# Altium PCB Mega2560_Custom.PcbDoc (part 3 of 5)
Units mil, origin at the board's own origin, x right, y up, seen from the top; angles counter-clockwise.
Board outline 4724.41 x 2992.13 mil, 2 copper layers (Top Layer, Bottom Layer), stack 57 mil thick; 197 components, 130 nets, 758 pads, 836 vias.
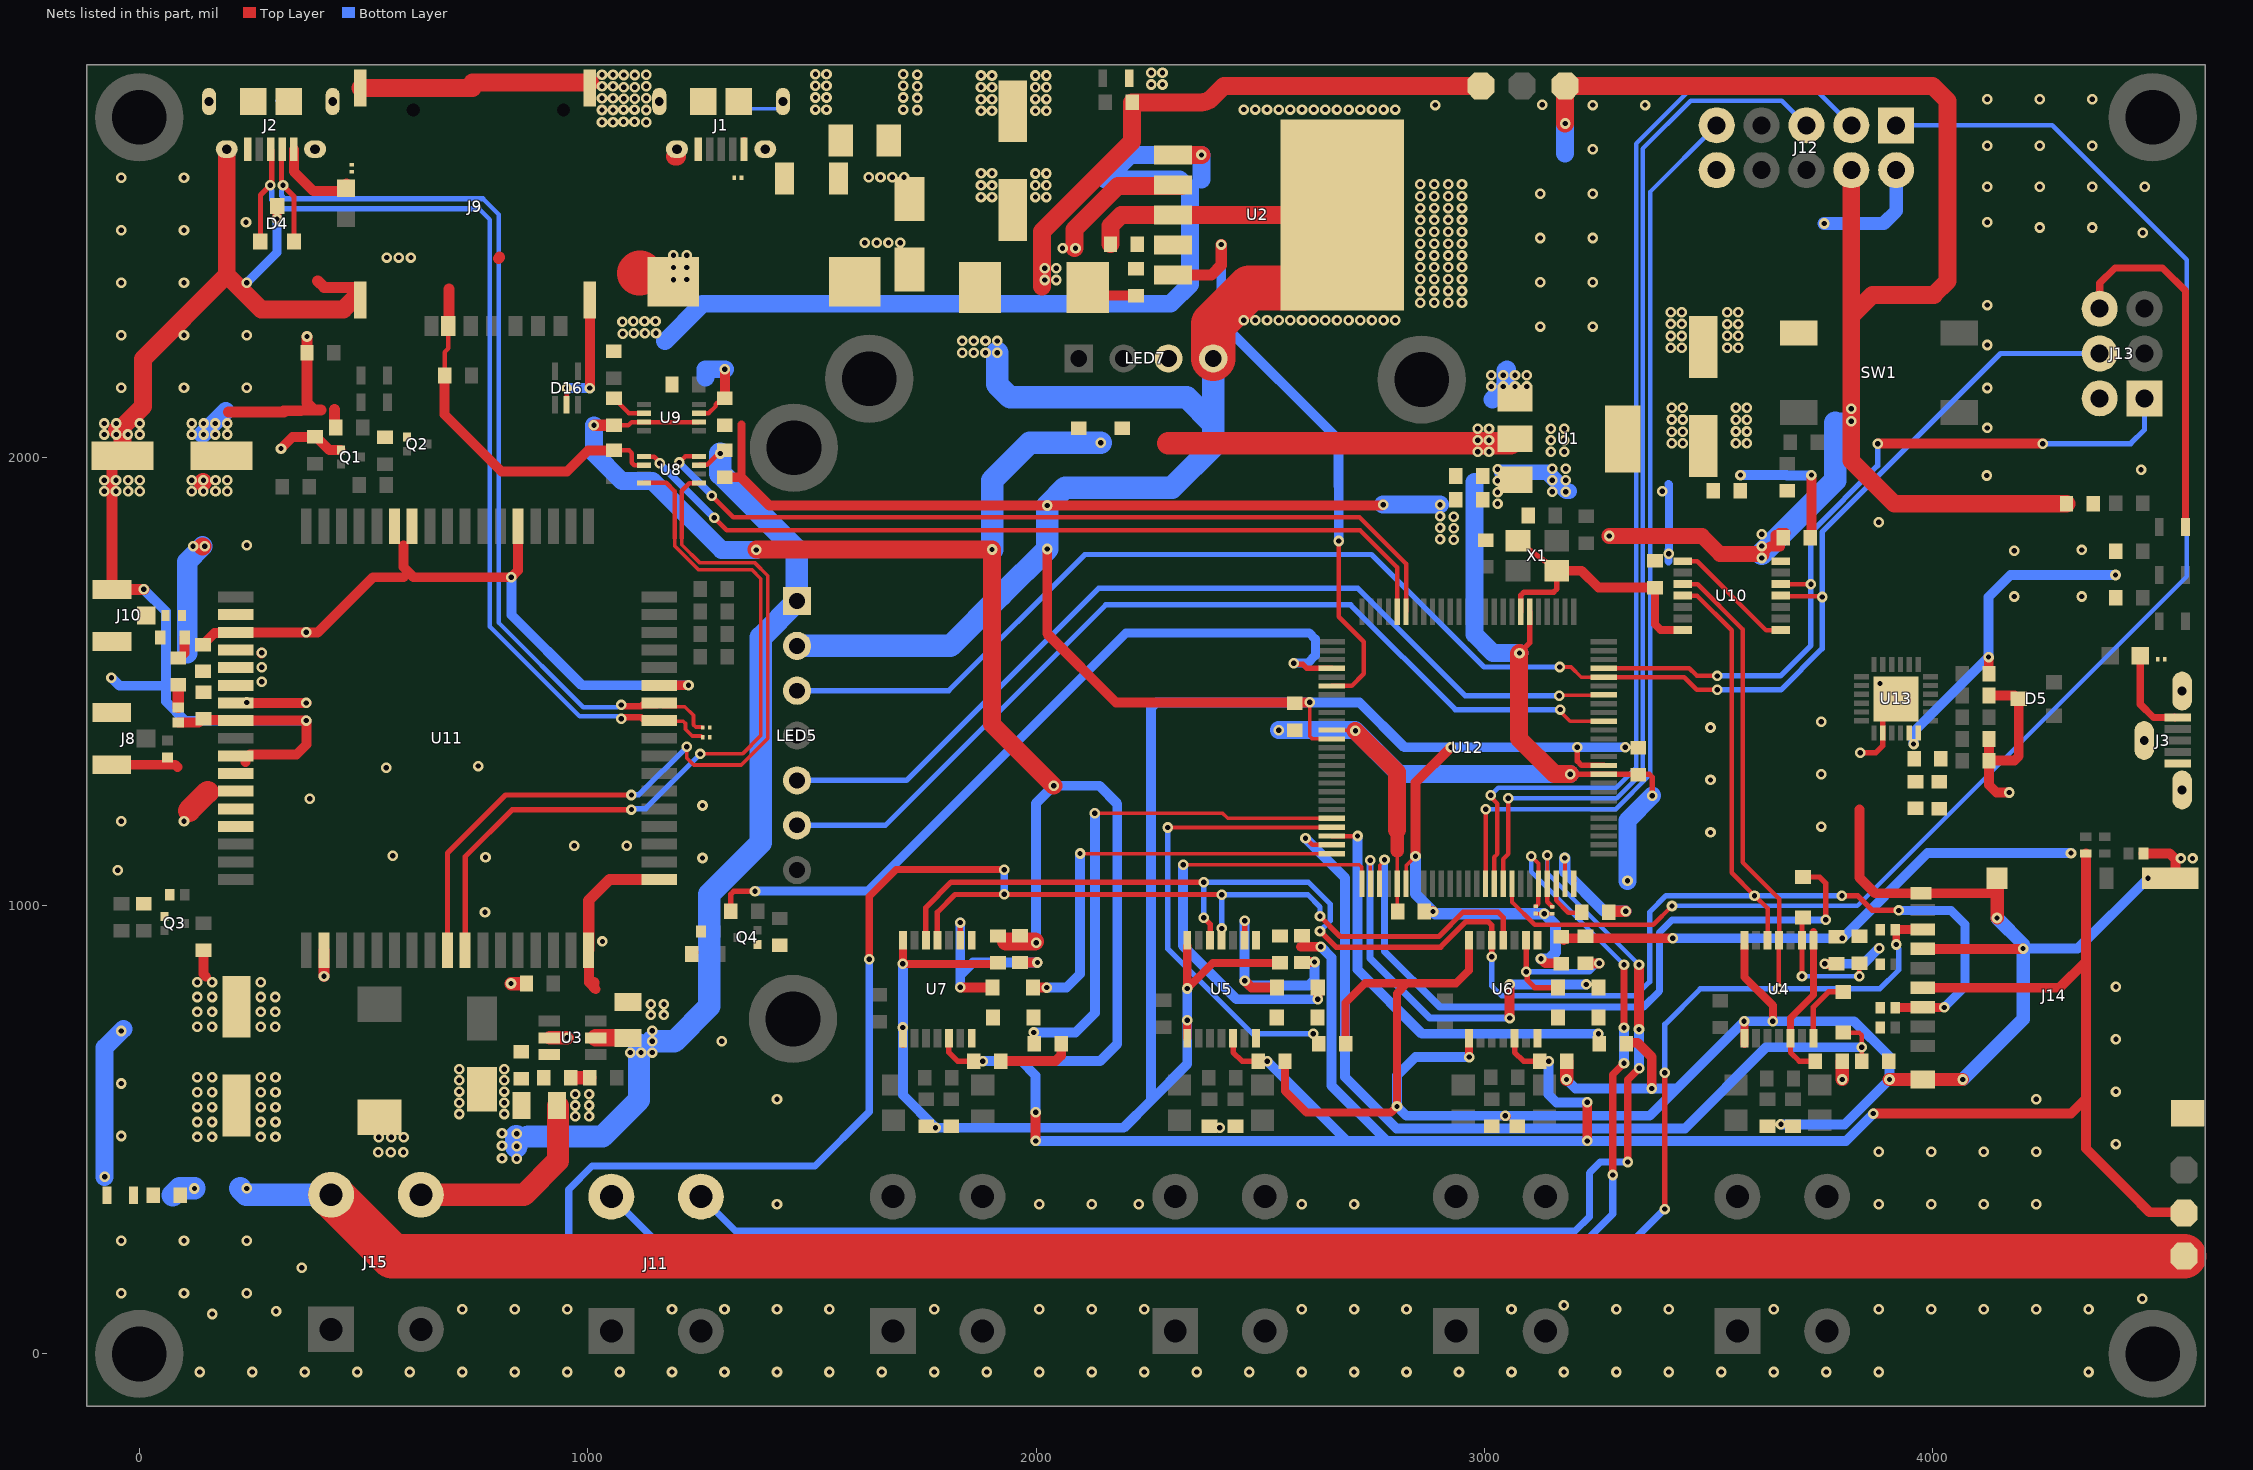
[diagram p2: the nets of this part, all layers, seen from the top]

## Part data (continued)
R43: library part RC0603FR-0747K5L, "RES 47.5K OHM 1% 1/10W 0603", Case Code (Imperial)=0603, Case Code (Metric)=1608, LCSC Part Number=C137715, Manufacturer=Yageo, Max Operating Temperature=155°C, Max Power Dissipation=100mW, Min Operating Temperature=-55°C, Package Quantity=5000, Resistance=47.5kR, Resistance Tolerance=1%, Resistor Type="Thick Film", Temperature Coefficient=100ppm/°C, Voltage Rating=50V, Case/Package=0603, Category="Chip SMD Resistors", ComponentLink1Description=https://datasheet.ciiva.com/11808/0900766b80f96399-11808343.pdf?src-supplier=RSComponents, ComponentLink1URL=https://datasheet.ciiva.com/11808/0900766b80f96399-11808343.pdf?src-supplier=RSComponents, ComponentLink2Description=https://datasheet.ciiva.com/2454/pyu-r-int-thick-7-2454790.pdf?src-supplier=Digi-Key, ComponentLink2URL=https://datasheet.ciiva.com/2454/pyu-r-int-thick-7-2454790.pdf?src-supplier=Digi-Key, ComponentLink3Description=https://datasheet.ciiva.com/2454/pyu-r-int-thick-7-2454791.pdf?src-supplier=Digi-Key, ComponentLink3URL=https://datasheet.ciiva.com/2454/pyu-r-int-thick-7-2454791.pdf?src-supplier=Digi-Key, ComponentLink4Description=https://datasheet.ciiva.com/2454/pyu-r-int-thick-7-2454789.pdf?src-supplier=Digi-Key, ComponentLink4URL=https://datasheet.ciiva.com/2454/pyu-r-int-thick-7-2454789.pdf?src-supplier=Digi-Key, ComponentLink5Description=https://datasheet.ciiva.com/12555/rc0603-272842-12555285.pdf?src-supplier=Mouser, ComponentLink5URL=https://datasheet.ciiva.com/12555/rc0603-272842-12555285.pdf?src-supplier=Mouser, ComponentLink6Description=https://datasheet.ciiva.com/15189/getdatasheetpartid-135115-15189741.pdf?src-supplier=Verical, ComponentLink6URL=https://datasheet.ciiva.com/15189/getdatasheetpartid-135115-15189741.pdf?src-supplier=Verical, Construction=Rectangular, Depth=0.8mm, Features="Moisture Resistant", Height=0.45mm, Item Type=Resistor, Lead Free="Lead Free", Length=1.6mm, Manufacturer Part Number=RC0603FR-0747K5L, Military Standard=Not, Number of Pins=2, Number of Terminations=2, Packaging="Tape and Reel", Power Rating=100mW, Pricing 1="5000=0.00133, 10000=0.00131, 20000=0.00127 (USD)", Reach SVHC Compliant=Yes, RoHS=Yes, RoHS Compliant=Yes, Series=RC, Size Code=0603, Stock 1=20000, Supplier 1=Avnet, Supplier Part Number 1=RC0603FR-0747K5L, Technology="THICK FILM", Termination=SMD/SMT, Tolerance=1%, Voltage Rating (DC)=50V, Width=0.031inch
R47: library part RC0402FR-0722RL, "RES 22 OHM 1% 1/16W 0402", Case Code (Imperial)=0402, Case Code (Metric)=1005, Manufacturer=Yageo, Max Operating Temperature=155°C, Max Power Dissipation=63mW, Min Operating Temperature=-55°C, Power Rating=62.5mW, Resistance=22R, Resistance Tolerance=1%, Resistor Type="Thick Film", Supplier Part Number 1=311-22.0LRCT-ND, Temperature Coefficient=100ppm/°C, Voltage Rating=50V, Case/Package=0402, Category="Chip SMD Resistors", ComponentLink1Description=https://datasheet.ciiva.com/11819/0900766b80c66297-11819462.pdf?src-supplier=RSComponents, ComponentLink1URL=https://datasheet.ciiva.com/11819/0900766b80c66297-11819462.pdf?src-supplier=RSComponents, ComponentLink2Description=https://datasheet.ciiva.com/7849/1018594-7849912.pdf?src-supplier=Element14, ComponentLink2URL=https://datasheet.ciiva.com/7849/1018594-7849912.pdf?src-supplier=Element14, ComponentLink3Description=https://datasheet.ciiva.com/7849/1018594-7849911.pdf?src-supplier=Element14, ComponentLink3URL=https://datasheet.ciiva.com/7849/1018594-7849911.pdf?src-supplier=Element14, ComponentLink4Description=https://datasheet.ciiva.com/16930/pyu-rc0402-51-rohs-l-6-r-16930687.pdf?src-supplier=Future+Electronics, ComponentLink4URL=https://datasheet.ciiva.com/16930/pyu-rc0402-51-rohs-l-6-r-16930687.pdf?src-supplier=Future+Electronics, ComponentLink5Description=https://datasheet.ciiva.com/26829/getdatasheetpartid-554995-26829991.pdf?src-supplier=Verical, ComponentLink5URL=https://datasheet.ciiva.com/26829/getdatasheetpartid-554995-26829991.pdf?src-supplier=Verical, Construction=Rectangular, Depth=0.5mm, Features="Moisture Resistant", Height=0.32mm, Lead Free="Lead Free", Length=1mm, Manufacturer Part Number=RC0402FR-0722RL, Military Standard=Not, Number of Pins=2, Number of Terminations=2, Packaging="Tape and Reel", Pricing 1="1=0.10000, 10=0.01400, 100=0.00580, 1000=0.00262, 2500=0.00228, 5000=0.00188 (USD)", Reach SVHC Compliant=Yes, RoHS=Yes, RoHS Compliant=Yes, Series=RC, Size Code=0402, Stock 1=7045379, Supplier 1=Digi-Key, Technology="THICK FILM", Termination=SMD/SMT, Tolerance=1%, Voltage Rating (DC)=50V, Width=0.5mm
R48: library part RC0402FR-07100KL, "RES 100K OHM 1% 1/16W 0402", Case Code (Imperial)=0402, Case Code (Metric)=1005, Manufacturer=Yageo, Max Operating Temperature=155°C, Max Power Dissipation=63mW, Min Operating Temperature=-55°C, Package Quantity=1, Resistance=100kR, Resistance Tolerance=1%, Resistor Type="Thick Film", Supplier Part Number 1=603-RC0402FR-07100KL, Temperature Coefficient=100ppm/°C, Voltage Rating=50V, Case/Package=0402, Category="Chip SMD Resistors", ComponentLink1Description=https://datasheet.ciiva.com/11819/0900766b80c66297-11819452.pdf?src-supplier=RSComponents, ComponentLink1URL=https://datasheet.ciiva.com/11819/0900766b80c66297-11819452.pdf?src-supplier=RSComponents, ComponentLink2Description=https://datasheet.ciiva.com/22747/1018594-22747509.pdf?src-supplier=Element14, ComponentLink2URL=https://datasheet.ciiva.com/22747/1018594-22747509.pdf?src-supplier=Element14, ComponentLink3Description=https://datasheet.ciiva.com/2453/pyu-r-int-thick-7-2453362.pdf?src-supplier=Digi-Key, ComponentLink3URL=https://datasheet.ciiva.com/2453/pyu-r-int-thick-7-2453362.pdf?src-supplier=Digi-Key, ComponentLink4Description=https://datasheet.ciiva.com/2453/pyu-r-int-thick-7-2453363.pdf?src-supplier=Digi-Key, ComponentLink4URL=https://datasheet.ciiva.com/2453/pyu-r-int-thick-7-2453363.pdf?src-supplier=Digi-Key, ComponentLink5Description=https://datasheet.ciiva.com/2453/pyu-r-int-thick-7-2453361.pdf?src-supplier=Digi-Key, ComponentLink5URL=https://datasheet.ciiva.com/2453/pyu-r-int-thick-7-2453361.pdf?src-supplier=Digi-Key, ComponentLink6Description=https://datasheet.ciiva.com/12667/pyu-rc0402-51-rohs-l-6-r-12667930.pdf?src-supplier=Mouser, ComponentLink6URL=https://datasheet.ciiva.com/12667/pyu-rc0402-51-rohs-l-6-r-12667930.pdf?src-supplier=Mouser, ComponentLink7Description=https://datasheet.ciiva.com/15189/getdatasheetpartid-323696-15189334.pdf?src-supplier=Verical, ComponentLink7URL=https://datasheet.ciiva.com/15189/getdatasheetpartid-323696-15189334.pdf?src-supplier=Verical, Construction=Rectangular, Depth=0.5mm, Features="Moisture Resistant", Height=0.016inch, Lead Free="Lead Free", Length=0.039inch, Manufacturer Part Number=RC0402FR-07100KL, Military Standard=Not, Number of Terminations=2, Packaging="Tape and Reel", Power Rating=63mW, Pricing 1="1=0.10000, 10=0.01200, 50=0.01200, 100=0.00500, 1000=0.00300, 2500=0.00200, 10000=0.00100 (USD)", REACH SVHC="No SVHC", RoHS=Yes, RoHS Compliant=Yes, Series=RC, Stock 1=7759549, Supplier 1=Mouser, Technology="THICK FILM", Termination=SMD/SMT, Tolerance=1%, Width=0.02inch, Working Voltage=50V
SB1 SB2: "Solder Bridge ON"
SW1: library part TL3301NF160QG, "SWITCH TACTILE SPST-NO 0.05A 12V", LCSC Part Number=C273526, Manufacturer=E-Switch, Manufacturer Part Number=TL3301NF160QG/TR, Package="SMD (6.00mm x 6.00mm)", ComponentLink1Description=LCSC, ComponentLink1URL=https://www.lcsc.com/product-detail/Tactile-Switches_E-Switch-TL3301NF160QG_C273526.html
U1: "15V 1.3V @ 800mA Fixed 3.3V SOT-223 Linear Voltage Regulators (LDO) ROHS", LCSC Part Number=C92102, Manufacturer="Diodes Incorporated", Package=SOT-223, ComponentLink1Description=LCSC, ComponentLink1URL=https://lcsc.com/product-detail/Linear-Voltage-Regulators-LDO_Diodes-Incorporated-AZ1117CH-3-3TRG1_C92102.html, Item Type=IC, Manufacturer Part Number=AZ1117CH-3.3TRG1
U2: "IC REG BUCK ADJ 3A TO263-5", Case/Package=TO-263, LCSC Part Number=C1355333, Manufacturer="TI National Semiconductor", Max Input Voltage=40V, Max Operating Temperature=125°C, Max Output Current=3A, Max Output Voltage=37V, Min Input Voltage=4.5V, Min Operating Temperature=-40°C, Min Output Voltage=1.2V, Quiescent Current=5mA, Supplier Part Number 1=926-LM2596S-ADJ/NOPB, Switching Frequency=173kHz, Category="Voltage Regulators - Switching", ComponentLink1Description=https://datasheet.ciiva.com/27056/2051160-27056491.pdf?src-supplier=Jameco, ComponentLink1URL=https://datasheet.ciiva.com/27056/2051160-27056491.pdf?src-supplier=Jameco, ComponentLink2Description=https://datasheet.ciiva.com/15112/getdatasheetpartid-55559-15112636.pdf?src-supplier=Verical, ComponentLink2URL=https://datasheet.ciiva.com/15112/getdatasheetpartid-55559-15112636.pdf?src-supplier=Verical, ComponentLink3Description=https://datasheet.ciiva.com/41457/001013814-da-01-en-ic-reg-buc-lm2596s-adj-nopb-to-263-5-tid-41457756.pdf?src-supplier=Conrad, ComponentLink3URL=https://datasheet.ciiva.com/41457/001013814-da-01-en-ic-reg-buc-lm2596s-adj-nopb-to-263-5-tid-41457756.pdf?src-supplier=Conrad, ComponentLink4Description=https://datasheet.ciiva.com/22669/1874590-22669464.pdf?src-supplier=Element14, ComponentLink4URL=https://datasheet.ciiva.com/22669/1874590-22669464.pdf?src-supplier=Element14, ComponentLink5Description=https://datasheet.ciiva.com/14150/jqlm2596x-xx-e-14150653.pdf?src-supplier=Distrelec, ComponentLink5URL=https://datasheet.ciiva.com/14150/jqlm2596x-xx-e-14150653.pdf?src-supplier=Distrelec, ComponentLink6Description=https://datasheet.ciiva.com/6596/lm2596-6596342.pdf?src-supplier=Digi-Key, ComponentLink6URL=https://datasheet.ciiva.com/6596/lm2596-6596342.pdf?src-supplier=Digi-Key, Contact Plating=Tin,Matte, Efficiency=73%, Height=4.57mm, Item Type=IC, Lead Free="Contains Lead", Length=10.16mm, Manufacturer Part Number=LM2596S-ADJ/NOPB, Mount="Surface Mount", Number of Outputs=1, Number of Pins=5, Operating Supply Voltage=40V, Output Current=3A, Output Type=Adjustable, Output Voltage=37V, Packaging=Rail/Tube, Pricing 1="1=7.15000, 10=6.46000, 50=6.16000, 100=5.34000, 1000=5.10000, 10000=5.10000 (USD)", Radiation Hardening=No, Reach SVHC Compliant=Yes, RoHS=Yes, RoHS Compliant=Yes, Series=LM2596, Supplier 1=Mouser, Weight=0.056128oz, Width=8.64mm
U3: "boost converterType 1 Boost 28V 2V~24V 1.2MHz SOT-23-6 DC-DC Converters ROHS", LCSC Part Number=C84817, Manufacturer="XI'AN Aerosemi Tech", Package=SOT-23-6, ComponentLink1Description=LCSC, ComponentLink1URL=https://www.lcsc.com/product-detail/DC-DC-Converters_XI-AN-Aerosemi-Tech-MT3608_C84817.html, Item Type=IC, Manufacturer Part Number=MT3608
U4 U5 U6 U7: "IC CONV THERMOCOUPLE 14TSSOP", Case/Package=TSSOP, LCSC Part Number=C2653162, Manufacturer=Maxim, Max Operating Temperature=125°C, Min Operating Temperature=-55°C, Operating Supply Current=1.2mA, Category="Interface ICs", ComponentLink1Description=https://media.digikey.com/pdf/Data%20Sheets/Maxim%20PDFs/PartNumberBreakdown_ds.pdf?src-supplier=Digi-Key, ComponentLink1URL=https://media.digikey.com/pdf/Data%20Sheets/Maxim%20PDFs/PartNumberBreakdown_ds.pdf?src-supplier=Digi-Key, ComponentLink2Description=http://datasheets.maximintegrated.com/en/ds/MAX31856.pdf?src-supplier=Avnet, ComponentLink2URL=http://datasheets.maximintegrated.com/en/ds/MAX31856.pdf?src-supplier=Avnet, Interface=SPI, Item Type=IC, Manufacturer Part Number=MAX31856MUD+T, Mount="Surface Mount", Number of Pins=14, Output Type=Digital, Packaging="Tape and Reel", Pricing 1="1=10.21890, 10=9.52090, 25=9.06320, 100=7.80510, 250=7.38990, 500=6.66890, 1000=6.39750, 3000=6.32960 (USD)", RoHS=Yes, RoHS Compliant=Yes, Stock 1=2890, Supplier 1="Arrow Electronics", Supplier Part Number 1=MAX31856MUD+T
U8: "IC TRNSLTR BIDIRECTIONAL US8", Case/Package=VSSOP, High Level Output Current=-20uA, LCSC Part Number=C2677366, Low Level Output Current=20uA, Manufacturer="Texas Instruments", Max Operating Temperature=85°C, Max Supply Voltage=5.5V, Min Operating Temperature=-40°C, Min Supply Voltage=1.65V, Output Current=50mA, Package Quantity=1, Category="Integrated Circuits (ICs)", ComponentLink1Description=https://datasheet.ciiva.com/4226/sces641b-4226901.pdf?src-supplier=Arrow+Electronics, ComponentLink1URL=https://datasheet.ciiva.com/4226/sces641b-4226901.pdf?src-supplier=Arrow+Electronics, ComponentLink2Description=https://datasheet.ciiva.com/15096/getdatasheetpartid-226009-15096242.pdf?src-supplier=Verical, ComponentLink2URL=https://datasheet.ciiva.com/15096/getdatasheetpartid-226009-15096242.pdf?src-supplier=Verical, ComponentLink3Description=https://datasheet.ciiva.com/14287/txb0102-14287498.pdf?src-supplier=Avnet, ComponentLink3URL=https://datasheet.ciiva.com/14287/txb0102-14287498.pdf?src-supplier=Avnet, ComponentLink4Description=https://datasheet.ciiva.com/14287/txb0102-14287370.pdf?src-supplier=Avnet, ComponentLink4URL=https://datasheet.ciiva.com/14287/txb0102-14287370.pdf?src-supplier=Avnet, ComponentLink5Description=https://datasheet.ciiva.com/6619/txb0102-6619255.pdf?src-supplier=Digi-Key, ComponentLink5URL=https://datasheet.ciiva.com/6619/txb0102-6619255.pdf?src-supplier=Digi-Key, ComponentLink6Description=https://datasheet.ciiva.com/6619/txb0102-6619256.pdf?src-supplier=Digi-Key, ComponentLink6URL=https://datasheet.ciiva.com/6619/txb0102-6619256.pdf?src-supplier=Digi-Key, ComponentLink7Description=https://datasheet.ciiva.com/6619/txb0102-6619257.pdf?src-supplier=Digi-Key, ComponentLink7URL=https://datasheet.ciiva.com/6619/txb0102-6619257.pdf?src-supplier=Digi-Key, Contact Plating=Gold, Data Rate=100Mbps, Height=0.85mm, Item Type=IC, Lead Free="Lead Free", Length=2.3mm, Logic Function=Translator, Manufacturer Part Number=TXB0102DCUT, Mount="Surface Mount", Number of Bits=2, Number of Channels=2, Number of Inputs=2, Number of Pins=8, Output Type=3-STATE, Packaging="Tape and Reel", Pricing 1="1=0.79330, 10=0.66470, 25=0.65820, 250=0.37450, 500=0.36200, 1000=0.29770, 2500=0.28440 (USD)", Propagation Delay=31ns, Radiation Hardening=No, REACH SVHC="No SVHC", RoHS=Yes, RoHS Compliant=Yes, Series=-, Stock 1=10, Supplier 1="Arrow Electronics", Supplier Part Number 1=TXB0102DCUT, Turn-On Delay Time=7.4ns, Weight=0.000339oz, Width=2mm
U9: "IC TRANSLTR BIDIRECTIONAL 8VSSOP", Case/Package=VSSOP, LCSC Part Number=C53434, Manufacturer="Texas Instruments", Max Operating Temperature=85°C, Max Supply Voltage=3.6V, Min Operating Temperature=-40°C, Min Supply Voltage=1.65V, Nominal Supply Voltage=1.8V, Package Body Material=Plastic, Package Shape=Rectangular, Package Style="SMALL OUTLINE, VERY THIN PROFILE, SHRINK PITCHMeter", Peak Reflow Temperature (Cel)=260°C, Power Supplies=1.8/3.3,2.5/5V, Supplier Part Number 1=595-TXS0102DCUR, Supply Voltage1-Max=5.5V, Supply Voltage1-Min=2.3V, Supply Voltage1-Nom=2.5V, Temperature Grade=INDUSTRIAL, Category="Voltage Level Shifters", Channels=1, ComponentLink1Description=https://www.ti.com:443/lit/ds/symlink/txs0102.pdf?src-supplier=IHS+Markit, ComponentLink1URL=https://www.ti.com:443/lit/ds/symlink/txs0102.pdf?src-supplier=IHS+Markit, ComponentLink2Description=https://datasheet.ciiva.com/22653/1846850-22653373.pdf?src-supplier=Farnell, ComponentLink2URL=https://datasheet.ciiva.com/22653/1846850-22653373.pdf?src-supplier=Farnell, ComponentLink3Description=https://datasheet.ciiva.com/15096/getdatasheetpartid-118249-15096172.pdf?src-supplier=Verical, ComponentLink3URL=https://datasheet.ciiva.com/15096/getdatasheetpartid-118249-15096172.pdf?src-supplier=Verical, ComponentLink4Description=https://datasheet.ciiva.com/1508/1857232-1508821.pdf?src-supplier=Element14, ComponentLink4URL=https://datasheet.ciiva.com/1508/1857232-1508821.pdf?src-supplier=Element14, ComponentLink5Description=https://datasheet.ciiva.com/28499/1863639-28499676.pdf?src-supplier=Element14, ComponentLink5URL=https://datasheet.ciiva.com/28499/1863639-28499676.pdf?src-supplier=Element14, ComponentLink6Description=https://datasheet.ciiva.com/46395/1863639-46395871.pdf?src-supplier=Element14, ComponentLink6URL=https://datasheet.ciiva.com/46395/1863639-46395871.pdf?src-supplier=Element14, ComponentLink7Description=https://datasheet.ciiva.com/1899/txs0102-1899369.pdf?src-supplier=Digi-Key, ComponentLink7URL=https://datasheet.ciiva.com/1899/txs0102-1899369.pdf?src-supplier=Digi-Key, ComponentLink8Description=https://datasheet.ciiva.com/1899/txs0102-1899368.pdf?src-supplier=Digi-Key, ComponentLink8URL=https://datasheet.ciiva.com/1899/txs0102-1899368.pdf?src-supplier=Digi-Key, ComponentLink9Description=https://datasheet.ciiva.com/1899/txs0102-1899370.pdf?src-supplier=Digi-Key, ComponentLink9URL=https://datasheet.ciiva.com/1899/txs0102-1899370.pdf?src-supplier=Digi-Key, ComponentLink10Description=https://datasheet.ciiva.com/14287/txs0102-14287516.pdf?src-supplier=Avnet, ComponentLink10URL=https://datasheet.ciiva.com/14287/txs0102-14287516.pdf?src-supplier=Avnet, Height - Seated (Max)=0.9mm, Interface IC Type="INTERFACE CIRCUIT", Item Type=IC, JESD-30 Code=R-PDSO-G8, JESD-609 Code=e4, Length=2.3mm, Manufacturer Part Number=TXS0102DCUR, Moisture Sensitivity Level=1, Pins=8, Pricing 1="1=0.93000, 10=0.83300, 50=0.79000, 100=0.64900, 1000=0.42300, 10000=0.40900 (USD)", Qualification Status="Not Qualified", Reach SVHC Compliant=Yes, RoHS=Yes, RoHS Compliant=Yes, Stock 1=246792, Supplier 1=Mouser, Surface Mount=Yes, Terminal Finish=Nickel, Terminal Form="Gull Wing", Terminal Pitch=0.5mm, Terminal Position=DUAL, Width=2mm
U10: "IC TRANSLATOR BIDIR 14TSSOP", Case/Package=TSSOP, High Level Output Current=-20uA, LCSC Part Number=C60708, Low Level Output Current=20uA, Manufacturer="Texas Instruments", Max Operating Temperature=85°C, Max Supply Voltage=5.5V, Min Operating Temperature=-40°C, Min Supply Voltage=1.2V, Nominal Supply Current=5uA, Package Quantity=2000, Quiescent Current=3.5uA, Category="Voltage Level Shifters", Channel Type=Bidirectional, ComponentLink1Description=https://datasheet.ciiva.com/1508/1633692-1508723.pdf?src-supplier=Element14, ComponentLink1URL=https://datasheet.ciiva.com/1508/1633692-1508723.pdf?src-supplier=Element14, ComponentLink2Description=https://datasheet.ciiva.com/22653/1845221-22653354.pdf?src-supplier=Farnell, ComponentLink2URL=https://datasheet.ciiva.com/22653/1845221-22653354.pdf?src-supplier=Farnell, ComponentLink3Description=https://datasheet.ciiva.com/15096/getdatasheetpartid-48026-15096134.pdf?src-supplier=Verical, ComponentLink3URL=https://datasheet.ciiva.com/15096/getdatasheetpartid-48026-15096134.pdf?src-supplier=Verical, ComponentLink4Description=https://datasheet.ciiva.com/1508/1849862-1508724.pdf?src-supplier=Element14, ComponentLink4URL=https://datasheet.ciiva.com/1508/1849862-1508724.pdf?src-supplier=Element14, ComponentLink5Description=https://datasheet.ciiva.com/46395/1864432-46395886.pdf?src-supplier=Element14, ComponentLink5URL=https://datasheet.ciiva.com/46395/1864432-46395886.pdf?src-supplier=Element14, ComponentLink6Description=https://datasheet.ciiva.com/1899/txb0104-1899515.pdf?src-supplier=Digi-Key, ComponentLink6URL=https://datasheet.ciiva.com/1899/txb0104-1899515.pdf?src-supplier=Digi-Key, ComponentLink7Description=https://datasheet.ciiva.com/1899/txb0104-1899514.pdf?src-supplier=Digi-Key, ComponentLink7URL=https://datasheet.ciiva.com/1899/txb0104-1899514.pdf?src-supplier=Digi-Key, ComponentLink8Description=https://datasheet.ciiva.com/1899/txb0104-1899516.pdf?src-supplier=Digi-Key, ComponentLink8URL=https://datasheet.ciiva.com/1899/txb0104-1899516.pdf?src-supplier=Digi-Key, ComponentLink9Description=https://datasheet.ciiva.com/14287/txb0104-14287375.pdf?src-supplier=Avnet, ComponentLink9URL=https://datasheet.ciiva.com/14287/txb0104-14287375.pdf?src-supplier=Avnet, Data Rate=100Mbps, Height=1.15mm, Item Type=IC, Lead Free="Lead Free", Length=5mm, Logic Function=Translator, Manufacturer Part Number=TXB0104PWR, Mount="Surface Mount", Number of Bits=4, Number of Channels=4, Number of Circuits=1, Number of Inputs=4, Number of Pins=14, Output Current=20uA, Output Type=3-STATE, Packaging="Tape and Reel", Pricing 1="1=1.50780, 10=1.39060, 25=1.29340, 100=1.11370, 250=1.03790, 500=0.97230, 1000=0.92410 (USD)", Propagation Delay=31ns, Radiation Hardening=No, Reach SVHC Compliant=Yes, RoHS=Yes, RoHS Compliant=Yes, Series=-, Stock 1=1658, Supplier 1="Arrow Electronics", Supplier Part Number 1=TXB0104PWR, Turn-On Delay Time=7.4ns, Weight=0.002018oz, Width=4.4mm
U11: "eMTC CAT-M1 Module 700MHz/1700MHz/1900MHz 3.8V LCC", LCSC Part Number=C126271, Manufacturer=Simcom, Category=Uncategorized, ComponentLink1Description=LCSC, ComponentLink1URL=https://www.lcsc.com/product-detail/2G-3G-4G-5G-Modules_SIMCom-Wireless-Solutions-SIM7000A_C126271.html, Item Type=Module, Manufacturer Part Number=SIM7000A, Pricing 1="50=18.60000, 100=17.40000, 200=16.20000, 300=15.60000, 400=15.00000, 500=15.00000, 5000=14.64000 (USD)", RoHS=No, Supplier 1=Avnet, Supplier Part Number 1=SIM7000A
U12: "IC MCU 8BIT 256KB FLASH 100TQFP", Case/Package=A, Frequency=16MHz, LCSC Part Number=C22460, Manufacturer=Microchip, Max Operating Temperature=85°C, Max Supply Voltage=5.5V, Min Operating Temperature=-40°C, Min Supply Voltage=4.5V, Operating Supply Voltage=5V, Package Body Material=Plastic, Package Code=TFQFP, Package Quantity=90, Package Shape=Square, Peak Reflow Temperature (Cel)=260°C, Supplier Part Number 1=68T2776, Temperature Grade=INDUSTRIAL, Time @ Peak Reflow Temperature-Max (s)=40s, Access Time=16us, Category=Uncategorized, ComponentLink1Description=https://datasheet.ciiva.com/22651/1698622-22651116.pdf?src-supplier=Farnell, ComponentLink1URL=https://datasheet.ciiva.com/22651/1698622-22651116.pdf?src-supplier=Farnell, ComponentLink2Description=https://datasheet.ciiva.com/15122/getdatasheetpartid-134542-15122545.pdf?src-supplier=Verical, ComponentLink2URL=https://datasheet.ciiva.com/15122/getdatasheetpartid-134542-15122545.pdf?src-supplier=Verical, ComponentLink3Description=https://datasheet.ciiva.com/29119/154804-da-01-en-atmega2560-16au-tqfp-100-29119580.pdf?src-supplier=Conrad, ComponentLink3URL=https://datasheet.ciiva.com/29119/154804-da-01-en-atmega2560-16au-tqfp-100-29119580.pdf?src-supplier=Conrad, ComponentLink4Description=https://datasheet.ciiva.com/6640/atmel-2549-8-bit-avr-microcontroller-atmega640-1280-1281-2560-2561-summary-6640293.pdf?src-supplier=Digi-Key, ComponentLink4URL=https://datasheet.ciiva.com/6640/atmel-2549-8-bit-avr-microcontroller-atmega640-1280-1281-2560-2561-summary-6640293.pdf?src-supplier=Digi-Key, ComponentLink5Description=https://datasheet.ciiva.com/1162/33246-1162139.pdf?src-supplier=Farnell, ComponentLink5URL=https://datasheet.ciiva.com/1162/33246-1162139.pdf?src-supplier=Farnell, ComponentLink6Description=https://datasheet.ciiva.com/1157/1817551-1157521.pdf?src-supplier=Element14, ComponentLink6URL=https://datasheet.ciiva.com/1157/1817551-1157521.pdf?src-supplier=Element14, ComponentLink7Description=https://datasheet.ciiva.com/16936/70123980-16936268.pdf?src-supplier=Allied+Electronics, ComponentLink7URL=https://datasheet.ciiva.com/16936/70123980-16936268.pdf?src-supplier=Allied+Electronics, Core Architecture=AVR, Data Bus Width=8b, Density=256KB, Height=1.05mm, Interface=I2C,SPI,UART,USART,EBI/EMI,2-Wire, Item Type=IC, JESD-30 Code=S-PQFP-G100, Lead Free="Lead Free", Length=14.1mm, Manufacturer Part Number=ATMEGA2560-16AU, Max Frequency=16MHz, Memory Size=256KB, Memory Type=FLASH, Moisture Sensitivity Level=3, Mount="Surface Mount", Number of ADC Channels=16, Number of I2C Channels=1, Number of I/O Lines=86, Number of I/Os=86, Number of Pins=100, Number of Programmable I/O=86, Number of PWM Channels=12, Number of SPI Channels=1, Number of Terminals/Pins=100, Number of Timers/Counters=6, Oscillator Type=Internal, Packaging=Tray, Peripherals="PWM,Brown-out Detect/Reset,POR,WDT", Pricing 1="1=12.70000 (USD)", Radiation Hardening=No, RAM Size=8KB, Reach SVHC Compliant=Yes, RoHS=Yes, RoHS Compliant=Yes, Series="AVR® ATmega", Stock 1=4, Supplier 1=Avnet, Surface Mount=Yes, Technology=CMOS, Terminal Finish=Tin, Terminal Form="Gull Wing", Terminal Position=QUAD, Termination=SMD/SMT, Watchdog Timer=Yes, Width=14.1mm
U13: "IC USB TO UART BRIDGE QFN24", LCSC Part Number=C969151, Manufacturer="Silicon Labs", Category="Interface ICs", ComponentLink1Description=https://www.silabs.com/documents/public/data-sheets/cp2102n-datasheet.pdf?src-supplier=Digi-Key, ComponentLink1URL=https://www.silabs.com/documents/public/data-sheets/cp2102n-datasheet.pdf?src-supplier=Digi-Key, Item Type=IC, Manufacturer Part Number=CP2102N-A02-GQFN24R, Pricing 1="1=2.66900, 10=2.64300, 25=2.61700, 100=2.59000, 250=2.56400 (USD)", RoHS=Yes, Stock 1=321, Supplier 1="Arrow Electronics", Supplier Part Number 1=CP2102N-A02-GQFN24R
X1: "16MHz SMD Crystal Resonator 9pF ±10ppm ±30ppm -40℃~+85℃ SMD3225-4P Crystals ROHS", LCSC Part Number=C13738, Manufacturer="Yangxing Tech", Package=SMD3225-4P, ComponentLink1Description=LCSC, ComponentLink1URL=https://www.lcsc.com/product-detail/Crystals_Yangxing-Tech-X322516MLB4SI_C13738.html, Item Type=Crystal, Manufacturer Part Number=X322516MLB4SI

## Free pads (board coordinates)
  round 196.85 hole 122.05: MH(0,0) MH(0,2757.77) MH(1457.82,746.95) MH(1459.82,2020.95) MH(1627.82,2174.95) MH(2859.82,2172.95) MH(4490.05,2757.77) MH(4490.05,0)

## Via types
v1: diameter 23.62, hole 11.81, Top Layer to Bottom Layer, 836 vias

## Nets (pads, with @x,y where several pads share a name; then routed paths per layer and width w, separated by ;. In a path a pad name is that pad's centre, name@x,y a point inside that pad or via, vN(x,y) a via of type N, cw(c..) or ccw(c..) an arc to the next point about the centre after c; other vN are vias at no path point)
3.3V: C6.1 C7.1 C9.2 C10.2 C12.2 C13.2 C19.2 C20.2 C21.2 C22.2 C30.1 C32.1 J14.4 LED7.3 P6.1 R8.2 R9.2 R14.2 R15.2 R36.2 R37.2 R48.2 U1.2 U1.4 U4.5 U4.8 U5.5 U5.8 U6.5 U6.8 U7.5 U7.8 U9.3 U9.6 U10.1 U10.8 | length 11766.6
  Top Layer w8: v1@3140,653 v1(3143,653) ; C30.1@3378.82,1771.95 C30.1@3383.05,1767.72
  Top Layer w10: C32.1@1058.82,2070.95 1090.82,2070.95 1097.98,2078.11 U9.3@1125.8,2078.11 U9.6@1247.85,2078.11 ; U10.1@3441.57,1767.72 3474.19,1767.72 3627.74,1614.18 U10.8@3660.07,1614.18
  Top Layer w12: U7.5@1805.23,703.91 1805.23,672.59 1824.82,653 C22.2@1860.82,653 ; U5.5@2439.41,703.91 2439.41,672.59 2459,653 C13.2@2495,653 ; U6.5@3067.27,703.91 3067.27,672.59 3086.86,653 C20.2@3122.86,653 ; U4.5@3682.27,690.91 3682.27,672.59 3701.86,653 C9.2@3737.86,653
  Top Layer w16: U4.5@3682.27,690.91 U4.5@3682.27,703.91 3682.27,749.27 3733.46,800.46 U4.8@3733.46,922.41 U4.8@3733.46,941.64
  Top Layer w22: v1(1999,475) v1(1999,539) ; 2590,908 v1(2635,908) ; C19.2@3176.52,922.5 3181.02,927 v1(3420,927) ; v1(3229,474.95) v1(3229,561) ; v1@3867.44,536 4308,536 4340.96,568.96 ; J14.4@3977.52,816.67 4282.54,816.67 4340.96,875.09 ; R48.2@4340.96,1116.26 4340.96,875.09 ; P6.1@4559.82,313.95 4557.82,315.95 4483.05,315.95 4465.54,333.46 4464.8,333.46 4464.58,333.68 4464.58,334.3 4463.96,334.3 4463.74,334.52 4463.74,335.26 4340.96,458.04 4340.96,568.96 ; 4340.96,568.96 4340.96,875.09
  Top Layer w25: v1(1013.82,2070.95) C32.1@1058.82,2070.95
  Top Layer w40: v1@1376,1793.95 v1(1901.82,1793.95) 1901.82,1404.18 v1(2039,1267) ; 1932.91,919.45 v1@1997.55,919.45 ; U1.2@3058.32,2031 U1.2@3067.82,2040.5
  Top Layer w50: 2295,2031 U1.2@3058.32,2031
  Bottom Layer w18: 3409.82,1767.72 v1@3409.82,1786.64 ; 3409.82,1939.95 3411,1938.77 3411,1794 3409.82,1792.82 v1@3409.82,1786.64 ; v1@3411,1786.64 v1@3409.82,1786.64
  Bottom Layer w22: v1(1880.96,653) 1967,653 ; v1(1999,475) 1999.05,474.95 2693.19,474.95 ; v1(1999,539) 1999,621 1967,653 ; v1(2000,917) 2000,1228 v1(2039,1267) 2141,1267 2181,1227 2181,691 2143,653 1967,653 ; v1(2515.14,653) 2693.19,474.95 ; v1(2635,908) 2659,884 2659,598.13 2782.18,474.95 ; v1(3143,653) 3143,578.14 3160.14,561 v1(3229,561) ; v1(3420,927) v1@3797.56,927 ; v1(3798,927) 3987.95,1116.95 v1(4307.82,1116.95) ; v1(3867,536) 3805.95,474.95 v1(3229,474.95) 2782.18,474.95 ; 2693.19,474.95 2782.18,474.95
  Bottom Layer w40: v1(1013.82,2070.95) 1013.82,2009.18 1076.05,1946.95 1144.82,1946.95 1298.77,1793 v1(1376,1793)
  Bottom Layer w50: v1(1901.82,1793.95) 1901.82,1947.82 1986,2032 v1(2144,2032)
  other v1: 3411,1784.64 3396,1924 2985,2011.67 3010,2011.67 3148,2011.67 3178,2011.67 3417.18,2030.82 3441.78,2030.82 2985,2037.33 3010,2037.33 3148,2037.33 3178,2037.33 3417.18,2056.82 3441.78,2056.82 2985,2063 3010,2063 3148,2063 3178,2063 3417.18,2083.82 3441.78,2083.82 3417.18,2109.82 3441.78,2109.82
5V: C1.1 C2.1 C3.1 C4.1 C31.1 C33.1 C45.1 C46.1 C47.1 C54.1 FB1.2 J12.4 L1.2 LED5.1 P1.1 R38.2 R39.2 R40.2 SB1.2 U1.3 U2.1 U3.5 U8.7 U9.7 U10.14 U12.10 U12.31 U12.61 U12.80 U12.100 | length 10697.9
  Top Layer w8: U12.61@2659.67,1391.17 2660.26,1390.58 2711.42,1390.58 v1(2712,1390) ; U12.80@2805.34,1049.31 2805.34,1121.66 ; U12.80@2805.67,1048.98 U12.80@2805.34,1048.65 2805.34,987.16 C46.1@2806,986.5 ; U12.100@3199.04,1048.65 3199.04,1053.04 U12.100@3200.95,1054.95
  Top Layer w10: U8.7@1247.85,1981.79 1248.75,1982.7 1266.36,1982.7 1295.82,2012.16 1295.82,2014.95 C54.1@1305.82,2014.95 1298.82,2007.95 v1(1295.82,2007.95) ; U9.7@1247.85,2097.79 1248.3,2098.24 1270.26,2098.24 1286,2113.98 1286,2118 1289.13,2121.13 1293.14,2121.13 C33.1@1302.96,2130.95 ; U12.80@2805.34,1049.31 U12.80@2805.67,1048.98
  Top Layer w12: v1(3078,1563) 3100.62,1585.62 U12.31@3100.62,1654.95 ; v1(3190.82,1292.95) 3190.93,1292.84 U12.10@3265.97,1292.84 ; U12.10@3265.97,1292.74 C47.1@3337.74,1292.74 ; C47.1@3337,1292 C47.1@3337.74,1292.74 ; v1(3374,1245) 3374,1285.97 3366.97,1293 3338,1293 C47.1@3337.74,1292.74
  Top Layer w22: C33.1@1305.82,2130.95 v1(1305.82,2195.95) ; v1@3618,1784 3632.95,1798.95 ; 3637.2,1800.45 3646.82,1800.45 ; 3648.82,1826.45 3648.82,1821.95 ; 3659.32,1800.45 3646.82,1800.45 ; C31.1@3670.82,1830.95 3657.82,1830.95 3648.82,1821.95 ; 3646.82,1800.45 3648.82,1802.45 3648.82,1821.95
  Top Layer w29.53: 2803,1168 2805.34,1165.66 2805.34,1121.66
  Top Layer w35: v1(3278,1824) 3485,1824 3525,1784 v1@3618,1784
  Top Layer w39.37: U3.5@1017.57,705 C3.1@1090,705 ; v1(2712,1390) 2805,1297
  Top Layer w40: C4.1@1947.82,2550.71 C4.1@1949.82,2552.71 ; U2.1@2305.07,2673.81 v1(2368.68,2673.81) ; 2805,1168 2805,1297 ; v1(3078,1563) 3076.82,1561.82 3076.82,1371.95 3155.82,1292.95 v1(3190.82,1292.95) ; v1(3179.82,2743.95) P1.1@3179.82,2827.95 3999.05,2827.95 4032.82,2794.18 4032.82,2392.82 4001.95,2361.95 3864.82,2361.95 3817.82,2314.95 ; J12.4@3817.82,2639.95 3817.82,2314.95 ; SB1.2@4297.82,1895.95 3913.82,1895.95 3817.82,1991.95 v1(3817.82,2079.95) v1(3817.82,2107.95) 3817.82,2314.95
  Bottom Layer w35: 3039,1966 3140,1966 3182.17,1923.83 v1@3189.17,1923.83
  Bottom Layer w40: 1172.82,2258.47 1256.3,2341.95 2299.95,2341.95 2343,2385 2343,2595.95 2320,2618.95 2154.18,2618.95 2209.04,2673.81 v1(2368.68,2673.81) 2368.68,2618.95 ; 1262.82,2177.95 1262.82,2195.95 v1(1305.82,2195.95) ; v1(2541,1391.08) 2711,1391 v1(2712,1390) 2809.05,1292.95 v1(3190.82,1292.95) ; 2978,1944 2978,1604 3019,1563 v1(3078,1563) ; 3179.82,2677 v1(3179.82,2743.95) ; v1(3318.82,1054.95) 3318.82,1189.82 v1(3374,1245) ; 3781.82,2076.95 3784.82,2079.95 v1(3817.82,2079.95)
  Bottom Layer w50: v1@840.82,461.95 v1@840.82,485.95 ; 867.82,484.95 1032.95,484.95 1114.32,566.32 1114.32,672 1114.32,690 ; v1(1144,697) 1193,697 1271,775 1271,1025 1386,1140 1386,1598.13 LED5.1@1466.82,1678.95 ; v1(1295.82,2007.95) 1295.82,1962.95 1465.82,1792.95 LED5.1@1465.82,1682.95 ; v1@3618,1784 3781.82,1947.82 3781.82,2076.95
  other v1: 841.82,434.95 808.82,435.95 533,450 561,450 589,450 841.82,462.95 808.82,463.95 534,483 562,483 590,483 841.82,490.95 808.82,491.95 1095,672 1119,672 1144,672 1144,721 3618,1775 3618,1801.5 3618,1828 3029,1896 3029,1921.67 3151,1922.67 3181,1922.67 3029,1947.33 3151,1948.33 3181,1948.33 3029,1973 3151,1974 3181,1974 1078.38,2275.05 1103,2276 1127.6,2276 1152.2,2276 1077.38,2302.05 1102,2303 1126.6,2303 1151.2,2303 1877,2579.82 1901.6,2579.82 1998.4,2579.82 2023,2579.82 1877,2605.82 1901.6,2605.82 1998.4,2606.15 2023,2606.15 1877,2632.82 1901.6,2632.82 1998.4,2632.48 2023,2632.48
12V: C5.1 C53.1 D6.1 J15.2 P5.1 R4.1 R6.2 | length 4453
  Top Layer w100: J15.2@427.82,354.95 564.82,217.95 P5.1@4559.82,217.95
  Bottom Layer w40: J15.2@426.82,353.95 J15.2@427.82,354.95
  Bottom Layer w50: 74.82,353.95 89.87,369 v1(123,369) v1(123,369) ; 224.72,369 238.77,354.95 425.82,354.95 J15.2@426.82,353.95
  other v1: 239.77,369.05 129.35,483.95 162.35,483.95 270.82,483.95 303.82,483.95 129.35,517.2 162.35,517.2 270.82,517.2 303.82,517.2 713.65,535 814,535 129.35,550.45 162.35,550.45 270.82,550.45 303.82,550.45 713.65,560 814,560 129.35,583.7 162.35,583.7 270.82,583.7 303.82,583.7 713.65,585 814,585 713.65,610 814,610 129.35,616.95 162.35,616.95 270.82,616.95 303.82,616.95 713.65,635 814,635
ADC0: D24.1 J11.4 U12.97 | length 3112.5
  Top Layer w8: U12.97@3139.99,1048.65 v1(3139.99,1112.01)
  Top Layer w10: U12.97@3139.99,1048.65 3139.99,1008.47 D24.1@3150.9,997.56
  Top Layer w16: v1(3319.41,427.95) 3319.41,611.41 v1(3345,637)
  Top Layer w22: v1@3344.41,730.59 v1(3344.41,868)
  Bottom Layer w10: v1(3139.99,1112.01) 3139.99,1072.42 v1(3344.41,868)
  Bottom Layer w16: J11.4@1252.62,350.95 1329.62,273.95 3201.82,273.95 3233.82,305.95 3233.82,403.82 3257.95,427.95 v1(3319.41,427.95) v1@3321,427.95
  Bottom Layer w22: v1@3344.72,723.28 3344.72,637.28 v1(3345,637)
  other v1: 3344.41,723.59
ADC1: D23.1 J11.2 U12.96 | length 3314.9
  Top Layer w8: v1(3104,1110) 3120.3,1093.7 U12.96@3120.3,1048.65
  Top Layer w10: D23.1@3114.45,997.95 3120.3,1003.81 U12.96@3120.3,1048.65
  Top Layer w16: v1(3286,398.95) 3286,623.11 v1(3311,648.11) ; v1@3311,734.59 v1(3311,868)
  Bottom Layer w10: v1(3104,1110) 3104,1075 v1(3311,868)
  Bottom Layer w16: J11.2@1052.62,350.95 1160.57,243 3216.87,243 3286,312.13 v1(3286,398.95)
  Bottom Layer w22: v1(3311,648.11) v1(3311,727.59)
AREF: C48.1 U12.98 | length 96
  Top Layer w10: U12.98@3159.67,1048.65 3159.67,1011.33 3187,984 C48.1@3207,984
CP_VDD: C51.1 C52.1 R44.1 R45.2 R46.2 SB2.1 SB2.2 U13.5 U13.6 | length 738
  Top Layer w22: v1(4124,1554) 4124.31,1553.69 4124.31,1517.69 R44.1@4125,1517
  Bottom Layer w22: v1(3956.82,1359.95) 3956.82,1386.82 v1(4124,1554) 4124,1688 4173,1737 v1(4407,1737)
CS1: D8.1 U12.78 | length 1593.3
  Top Layer w8: U12.78@2765.97,1048.65 2765.97,1090.05 2776.82,1100.9 v1(2776.82,1101.95)
  Top Layer w12: D8.1@3710,1063.55 3747.45,1063.55 3760.82,1050.18 v1(3760.82,967.95)
  Bottom Layer w16: v1(2776.82,1101.95) 2776.82,897.18 2900,774 3355,774 3390,809 3390,940 3417.95,967.95 v1(3760.82,967.95)
CS2: D12.1 U12.77 | length 884
  Top Layer w8: v1(2744.82,1100.95) 2745.55,1100.22 2745.55,1049.38 U12.77@2746.29,1048.65
  Top Layer w22: v1(3056,749) v1(3056,824)
  Bottom Layer w16: v1(2744.82,1100.95) 2744.82,882.18 2878,749 v1(3056,749)
  Bottom Layer w22: v1(3056,824) v1(3227,824)
CS3: D9.1 U12.76 | length 994
  Top Layer w8: v1(2327.82,1090.95) 2720.82,1090.95 2726.6,1085.17 U12.76@2726.6,1048.65
  Top Layer w22: v1(2628,791) D9.1@2628,817
  Bottom Layer w22: v1(2327.82,1090.95) 2327.82,910.18 2447,791 v1(2628,791)
CS4: D13.1 U12.75 | length 948.1
  Top Layer w8: v1@2098,1115.58 U12.75@2659.67,1115.58
  Top Layer w22: D13.1@1993,817 v1(2024,817)
  Bottom Layer w22: v1(2024,817) 2068,817 2098,847 v1(2098,1116)
CS_LCD: LED5.5 U12.19 | length 2078
  Top Layer w8: v1(3166.82,1467.95) 3167.8,1468.93 3264.99,1468.93 U12.19@3265.97,1469.91
  Bottom Layer w12: LED5.5@1465.82,1282.95 LED5.5@1466.82,1282.95 ; LED5.5@1466.82,1278.95 1710.82,1278.95 2139.76,1707.89 2716.85,1707.89 2956.79,1467.95 v1(3166.82,1467.95)
D\R\D\Y\1\: D10.1 R12.2 U12.74 | length 2009.4
  Top Layer w10: v1(2600.82,1149.95) 2615.51,1135.26 U12.74@2659.67,1135.26 ; D10.1@3800,716.72 3835.14,716.72 3841,710.87 v1(3841,683.93) R12.2@3841,653
  Bottom Layer w22: v1(2600.82,1149.95) 2689,1061.77 2689,617.77 2803.77,503 3446.87,503 3627.81,683.93 v1(3841,683.93)
D\R\D\Y\2\: D14.1 R18.2 U12.73 | length 947.4
  Top Layer w10: U12.73@2659.67,1154.95 v1@2713.82,1154.95
  Bottom Layer w22: v1@2716.82,1153.95 2716.82,857.18 2860,714 v1(3254,714)
  other v1: 2716.82,1154.95
D\R\D\Y\3\: D11.1 R13.2 U12.72 | length 1039.4
  Top Layer w8: v1(2293.82,1173.95) 2658.99,1173.95 U12.72@2659.67,1174.63
  Bottom Layer w12: v1(2293.82,1173.95) 2293.82,903.18 2483,714 v1(2618,714)
D\R\D\Y\4\: D15.1 R19.2 U12.71 | length 1133.3
  Top Layer w8: v1(2131,1206) 2415.77,1206 2427.45,1194.32 U12.71@2659.67,1194.32
  Bottom Layer w22: v1(1995,717) 2088,717 2131,760 v1(2131,1206)
DC_LCD: LED5.6 U12.16 | length 2113.7
  Top Layer w8: v1(3168.82,1436.95) 3171.81,1433.96 3171.81,1429.73 3190.69,1410.85 U12.16@3265.97,1410.85
  Bottom Layer w12: LED5.6@1465.82,1182.95 LED5.6@1466.82,1182.95 ; LED5.6@1466.82,1178.95 1663.82,1178.95 2155.28,1670.41 2701.33,1670.41 2934.79,1436.95 v1(3168.82,1436.95)
FB_12V: R4.2 R5.2 U3.3
GND: C1.2 C2.2 C3.2 C4.2 C5.2 C6.2 C7.2 C8.2 C9.1 C10.1 C11.1 C12.1 C13.1 C14.1 C17.2 C18.2 C19.1 C20.1 C21.1 C22.1 C23.1 C24.1 C27.2 C28.2 C29.2 C30.2 C31.2 C32.2 C33.2 C34.1 C35.1 C36.2 C37.2 C38.2 C40.1 C41.1 C42.1 C43.2 C45.2 C46.2 C47.2 C48.2 C49.2 C50.2 C51.2 C52.2 C53.2 C54.2 D1.2 D2.2 D3.2 D4.3 D5.3 D7.2 D16.2 D17.2 D18.2 D19.1 D20.1 D21.2 D22.2 D23.2 D24.2 D25.2 D26.2 D27.2 D28.2 D29.2 J1.5 J1.MH1 J1.MH2 J1.MH3 J1.MH4 J1.MP1 J1.MP2 J2.5 J2.MH1 J2.MH2 J2.MH3 J2.MH4 J2.MP1 J2.MP2 J3.5 J3.SH1 J3.SH2 J3.SH3 J8.2 J8.3 J9.1 J9.2 J9.3 J9.4 J9.C5 J10.2 J10.3 J12.2 J12.10 J13.6 J14.6 J14.S1 J14.S2 J14.S3 J14.S4 J14.SW-B J15.4 LED1.2 LED2.2 LED5.2 LED6.2 LED7.4 Q1.1 Q2.1 Q3.1 Q4.1 R2.2 R3.1 R5.1 R12.1 R13.1 R18.1 R19.1 R28.2 R30.2 R32.2 R34.2 R43.2 SW1.1 U1.1 U2.3 U2.6 U3.2 U4.1 U4.14 U5.1 U5.14 U6.1 U6.14 U7.1 U7.14 U8.2 U9.2 U10.7 U11.2 U11.17 U11.18 U11.29 U11.39 U11.45 U11.46 U11.54 U11.58 U11.59 U11.61 U11.62 U11.63 U11.64 U11.65 U12.11 U12.32 U12.62 U12.81 U12.99 U13.2 U13.25 X1.2 X1.4 | length 27913.6
  Top Layer w8: v1(2610,1453) 2610,1377.77 2616.29,1371.48 U12.62@2659.67,1371.48 ; U12.81@2825.03,1048.65 2825,1089 v1(2846,1110) ; D23.2@3114.45,982.2 3115.11,982.2 3115.5,981.81 v1(3132.82,981.81) D24.2@3150.9,981.81 ; v1(3179,1106) 3179.36,1105.64 U12.99@3179.36,1048.65 ; U13.25@3888.29,1431.42 U13.25@3917.82,1460.95 ; J14.S2@4141.82,1061.81 J14.S2@4142.87,1060.76
  Top Layer w10: C34.1@680.82,2181.95 680.82,2233.95 689.13,2242.26 J9.C5@689.13,2292.45 ; D16.2@952.82,2116.55 v1(952.82,2153.95) ; C29.2@1058.82,2014.95 1092.12,2014.95 1097.98,2009.09 1097.98,1987.65 1103.84,1981.79 U8.2@1125.8,1981.79 ; C32.2@1058.82,2130.95 1061.32,2130.95 1071.32,2120.95 1071.32,2118.45 1091.53,2098.24 1125.35,2098.24 U9.2@1125.8,2097.79
  Top Layer w12: R30.2@540.96,2037.08 R30.2@547.82,2043.95 ; X1.2@3074.52,1813.41 3096.07,1795.79 3139.57,1764.11 X1.4@3161.13,1746.48 3161.13,1705.98 3154.1,1698.95 3088.06,1698.95 3081.03,1691.92 3081.03,1655.04 U12.32@3080.93,1654.95 ; v1@3206.82,1351.95 3206.82,1321.95 3216.34,1312.43 U12.11@3265.97,1312.43 ; v1(3837.82,1340.95) 3872.82,1340.95 3888.29,1356.42 U13.2@3888.29,1384.18 U13.25@3888.29,1431.42
  Top Layer w16: J13.6@4371.82,2330.95 4371.82,2387.95 4405.82,2421.95 4511.82,2421.95 4563.53,2370.24 LED6.2@4563.53,1844 ; J3.SH1@4555.67,1478.18 J3.SH1@4560.89,1483.41
  Top Layer w18: 1342.82,1954.95 1342.82,2072.95 ; U7.1@1702.87,690.91 U7.1@1702.87,703.91 v1(1702.87,727.9) ; U7.14@1702.87,909.41 v1(1702.87,869.95) C21.1@1920.93,869.95 ; U5.1@2337.05,703.91 v1@2337.03,743.97 ; v1(2337,815) v1(2337,815) ; U5.14@2337.05,909.41 v1(2337,815) ; C12.1@2544,871.95 2393.95,871.95 v1(2337,815) ; C13.1@2555,653 2555,586 2603,538 2791.12,538 v1@2804.42,551.29 ; R13.1@2690,692 2690,783 2733.69,826.69 2827.69,826.69 ; v1@2804.82,551.39 v1(2804.82,551.95) 2804.82,803.82 2827.69,826.69 ; U6.1@2964.91,703.91 2965.05,703.76 2965.05,662.95 v1(2966,662) ; U6.14@2964.91,922.41 2964.91,854.91 2936.69,826.69 2827.69,826.69 ; C30.2@3379.94,1708.83 3379.94,1627.06 3392.82,1614.18 U10.7@3441.57,1614.18 ; v1@3579.77,739 3579.77,691.05 U4.1@3579.91,690.91 ; U4.14@3579.91,909.41 3579.91,840.09 3643,777 v1(3643,741.95)
  Top Layer w20: v1(307,2531) 307,2559.14 D4.3@307.6,2559.74
  Top Layer w22: J8.3@-61.53,1313.88 79.89,1313.88 84.82,1308.95 ; D21.2@87,1408 87.17,1408.17 132.67,1408.17 140.5,1416 C37.2@143,1416 145.44,1413.56 213.62,1413.56 U11.59@214.82,1412.36 v1(372.56,1412.36) 372.56,1358.69 350.82,1336.95 246.82,1336.95 236.82,1326.95 236.82,1319.95 ; C38.2@142,1582 144.5,1582 148.5,1586 148.5,1589.08 167.43,1608 213.62,1608 U11.54@214.82,1609.21 v1(372.56,1609.21) 398.08,1609.21 520.82,1731.95 588.82,1731.95 589.82,1732.95 ; C41.1@143,900 143,847 149,841 ; U11.58@214.82,1451.73 v1(372.56,1451.73) ; v1(316,2019) 342,2045 R28.2@392,2045 394.5,2045 423.75,2015.75 Q1.1@449.36,2015.75 ; 588.82,1803.45 588.82,1754.95 610.82,1732.95 ; 610.82,1731.95 v1(829.82,1731.95) 844.74,1746.87 U11.39@844.74,1845.43 ; C34.1@680.82,2181.95 680.82,2094.95 807.77,1968 953.87,1968 1000.82,2014.95 C29.2@1058.82,2014.95 ; U11.17@1002.22,900.55 1003.01,899.76 1003.01,828.18 1017.82,813.37 ; J9.1@1004.88,2350.72 1004.88,2154.7 v1@1005.19,2154.39 ; U11.29@1159.7,1491.1 v1(1224.67,1491.1) ; C40.1@1232,892 C40.1@1235.88,895.88 ; C54.2@1305.82,1954.95 1341.82,1954.95 1404.82,1891.95 v1(2024.82,1891.95) 2771.38,1891.95 2773.38,1893.95 v1(2773.82,1893.95) ; C33.2@1305.82,2070.95 C33.2@1309.82,2066.95 ; C22.1@1920.82,653 2043,653 2055.89,665.89 2055.89,691.89 R19.1@2056,692 ; v1@2024.82,1794.51 2024.82,1605.95 2177.77,1453 2574.95,1453 C45.2@2577,1450.95 2578.74,1452.69 2609.69,1452.69 v1(2610,1453) ; v1(2846,1110) 2846,1274 v1(2925,1353) ; v1@3046,530 v1@3048,530 ; v1(3126,881) 3126.44,881 3136.22,871.22 3169.55,871.22 C19.1@3170.82,869.95 ; X1.4@3161.13,1746.48 3216.52,1746.48 3254.17,1708.83 C30.2@3379.94,1708.83 ; R18.1@3316,692 3318,694 3341,694 3373,662 v1(3373,592) ; C7.2@3569.82,1924.95 C7.2@3570.51,1925.64 ; v1@3570.51,1959.64 v1(3570.82,1959.95) ; C31.2@3726,1820 3729,1823 v1@3729,1959.2 ; v1@3759.31,869.69 C10.1@3786.26,869.69 ; C10.1@3784.26,870.69 C10.1@3785,869.95 ; 3835.82,1213.95 3835.82,1061.95 3870.48,1027.3 J14.SW-B@3973.58,1027.3 4142.87,1027.3 4146.48,1027.3 ; J14.6@3977.52,903.28 4199.84,903.28 4200.56,904 v1(4201,904) ; C49.2@4125,1371.5 C50.2@4125,1323 ; R43.2@4125,1468.5 4181.93,1468.5 4189.48,1460.95 D5.3@4191.45,1460.95 4191.45,1333 4181.45,1323 C50.2@4125,1323 ; v1(4170,1252) 4142,1252 4125,1269 C50.2@4125,1323 ; D29.2@4469.73,1116 4528.11,1116 4541,1103.11 4541,1073.06 J14.S3@4528.7,1060.76 v1(4479.76,1060.76)
  Top Layer w25: C36.2@-61.18,1990 J10.2@-61.18,1705.02 v1(9.89,1705.02) ; J2.MH2@192.28,2673.4 J2.MH2@195.03,2670.65 ; 398,2392.64 412.64,2378 491.79,2378 J9.2@491.79,2357.95 ; U11.2@411.67,900.55 411.97,900.25 v1@411.97,842.03 ; J9.C5@689.13,2292.45 690.81,2294.13 690.81,2375 ; U11.17@1002.22,900.55 1002.22,1011.35 1048.9,1058.03 U11.18@1159.7,1058.03 ; 1011.32,825.45 1013.82,827.95 ; C46.2@2866,986.5 v1(2885,986.5) ; C48.2@3274.5,986 3275.5,987 v1(3315,987)
  Top Layer w30: v1(829,826) C35.1@863.48,826 ; U3.2@915.43,705 v1(954,705) ; R5.1@962,616 R3.1@1005,616 ; v1(3182.86,612) C20.1@3182.86,653 ; v1(3797.86,612) C9.1@3797.86,653 ; v1(3903,612) 3903.06,611.94 J14.S1@3977.52,611.94 v1@4065.22,611.94 ; v1@4142.87,973.06 4142.87,1027.3 J14.S2@4142.87,1060.76
  Top Layer w40: v1@-50,2060 -44.92,2060 8,2112.92 8,2218.95 195.03,2405.97 ; C36.2@-37.24,2003 -37.24,2060 ; C36.2@-0.18,1996.82 C36.2@1.82,1994.82 ; J2.MH2@195.03,2670.65 195.03,2405.97 ; J9.2@483.91,2357.95 454.96,2329 272,2329 195.03,2405.97 ; J9.3@493.07,2823.16 743.32,2823.16 ; 743.32,2835.45 J9.4@1004.88,2835.45 ; J1.MH2@1194.74,2670.65 J1.MH2@1199.03,2670.65 ; C4.2@1947.82,2771.18 C4.2@1949.82,2773.18 ; R2.2@2165.82,2474.95 2165.82,2515.95 2189.82,2539.95 U2.3@2305.07,2539.95 U2.6@2682.82,2539.95
  Top Layer w50: 111,1211.63 152.32,1252.95 ; J15.4@627.82,354.95 857.82,354.95 933.82,430.95 C5.2@933.82,552.95
  Top Layer w100: LED7.4@2395,2220 2395,2297.12 2475.22,2377.35 2595.22,2377.35 2682.82,2464.95 U2.6@2682.82,2539.95
  Bottom Layer w8: 307,2794.75 315.25,2803 ; J2.MH3@421.2,2803 J2.MH3@431.25,2792.95 ; 1348.63,2770.76 1354.82,2776.95 J1.MH3@1435.25,2776.95
  Bottom Layer w16: J3.SH1@4555.67,1463.92 J3.SH1@4555.67,1478.18
  Bottom Layer w20: v1(239.77,2388.72) 307,2455.95 v1(307,2531)
  Bottom Layer w22: v1(-62.18,1507.95) -44.18,1489.95 59.36,1489.95 ; v1(9.89,1705.02) 59.36,1655.56 59.36,1489.95 ; v1(372.56,1412.36) 372.15,1411.95 102.05,1411.95 59.36,1454.64 59.36,1489.95 ; v1@829.82,1732.51 v1(829.82,1731.95) 829.82,1647.95 986.67,1491.1 v1(1224.67,1491.1) ; v1(952.82,2153.95) v1(1004.88,2153.95) ; v1(1702.87,869.95) v1(1702.87,727.9) 1702.87,577.4 v1(1775.82,504.45) 2195.32,504.45 2255.93,565.06 ; v1(2337,815) v1(2337,744) 2337.05,743.95 2337.05,646.18 2255.93,565.06 ; v1(2925,1353) 2821,1353 2721,1453 v1(2610,1453) 2268.82,1453 2255.93,1440.11 2255.93,565.06 ; v1@2926.82,1352.95 v1(3206.82,1352.95) v1(3313.95,1352.95) ; v1(2966,662) 2845.65,662 2804.82,621.17 v1(2804.82,551.95) 2825.77,531 v1(3046,531) 3367.82,531 3428.82,592 ; v1(3182.86,612) 3202.86,592 v1(3373,592) 3428.82,592 ; v1(3570.82,1959.95) 3673.19,1959.95 3674.14,1959 v1@3729,1959 ; v1@3578.51,741.64 3428.87,592 3428.82,592 ; v1(3578.82,741.95) v1(3643,741.95) 3824.05,741.95 3903,663 v1(3903,612) 3903,611.94 3803.06,512 v1(3661,512) ; v1(3759,870) 3845,870 v1(3880,905) ; v1(4201,904) 4323,904 4479.23,1060.23 4479.78,1060.23 v1@4480,1060.01
  Bottom Layer w25: v1(2846,1110) 2846,1025.5 v1(2885,986.5) 2889.69,981.81 v1(3132.82,981.81) 3158,956.63 3158,895.64 3143.36,881 v1(3126,881) ; v1(3179,1106) 3179,1075 3267,987 v1(3315,987)
  Bottom Layer w30: v1(3757.82,2520.95) 3889.82,2520.95 3917.82,2548.95 J12.2@3917.82,2639.95 ; v1(4066.21,611.94) 4201,746.73 v1(4201,904) 4201,913.94 v1(4142.87,972.07)
  Bottom Layer w40: v1(-77.18,394.95) -77.18,683.11 v1(-40.23,720.05) v1@-35.33,724.95 ; v1(2773.82,1893.95) v1(2900.82,1893.95) ; 3018,2128.75 3046.82,2157.58 3046.82,2192.95 ; 3047.82,2192.95 3049.82,2194.95
  Bottom Layer w50: LED5.2@1466.82,1578.95 1808.82,1578.95 1921.87,1692 v1(2024.82,1794.95) v1(2024.82,1891.95) 2064.87,1932 2303,1932 2395,2024 2395,2074 ; v1(1913,2233) 1913,2162.29 1942.29,2133 2336,2133 2395,2074 ; LED7.4@2395,2220 2395,2074